# Altium PCB MARLIN.PcbDoc
Units mm, origin at the board's own origin, x right, y up, seen from the top; angles counter-clockwise.
Board outline 14 x 55 mm, 2 copper layers (Top Layer, Bottom Layer), stack 1.595 mm thick; 1 components, 2 nets, 7 pads, 6 vias.
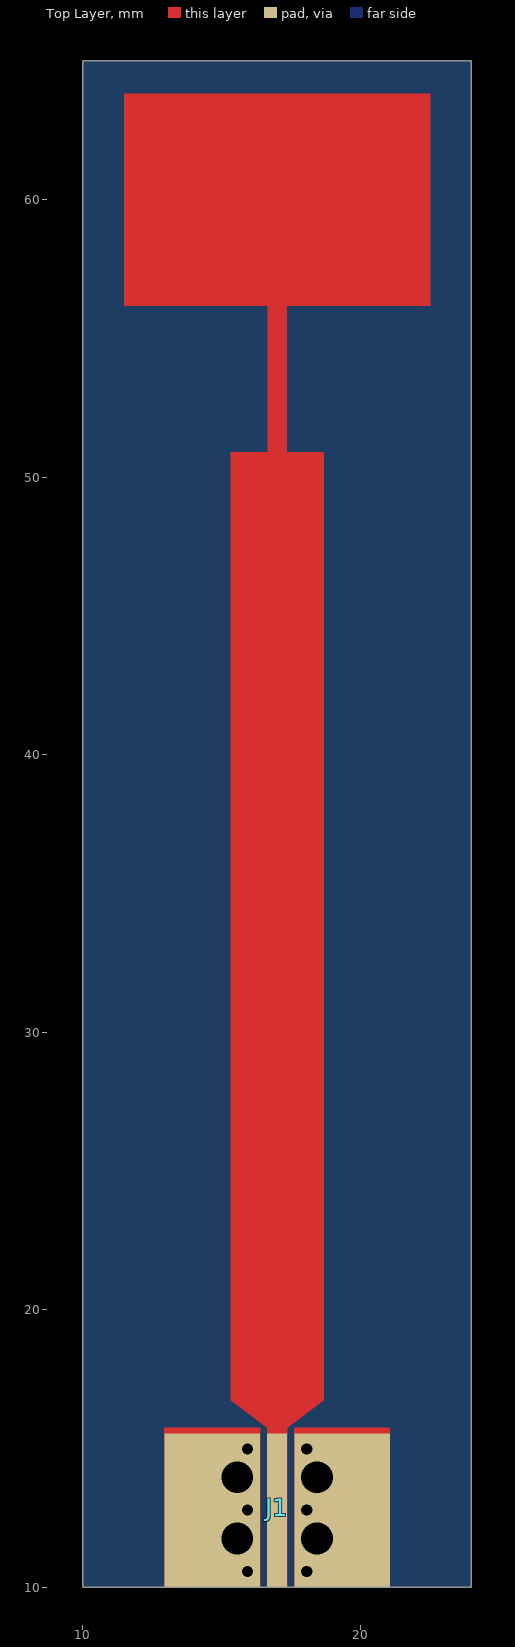
[diagram p0: Top Layer view]
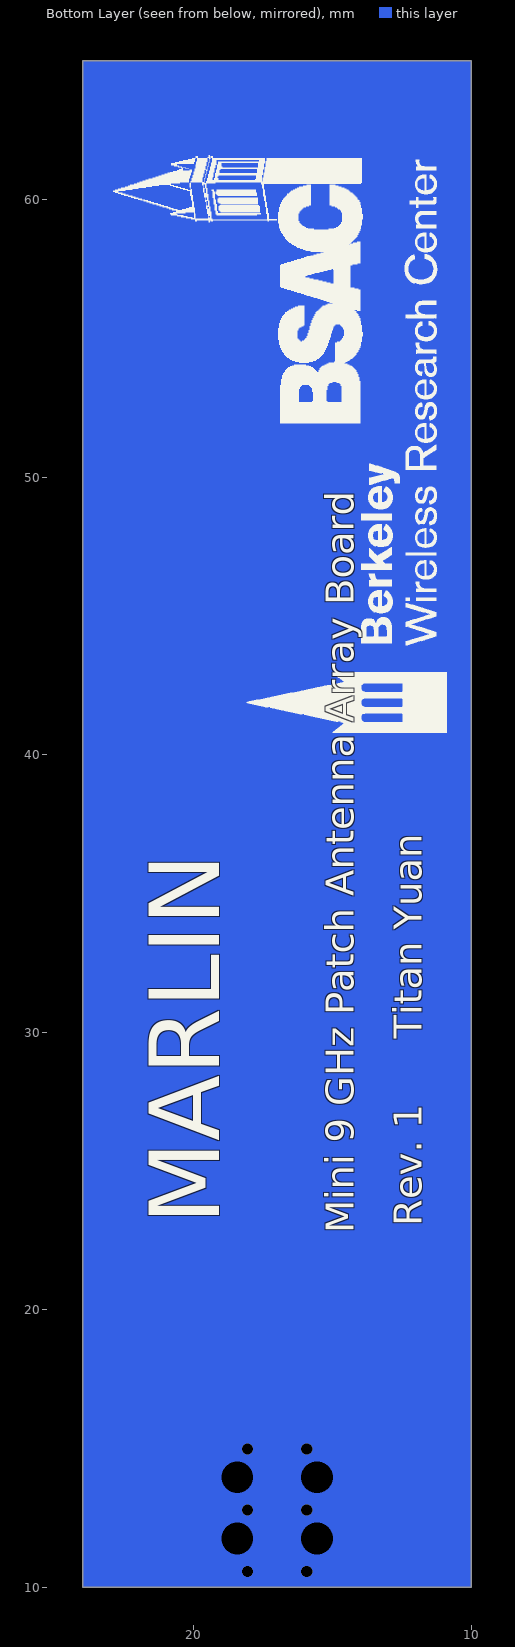
[diagram p1: Bottom Layer view, seen from below]

## Layer stack, top to bottom
Top Solder: solder mask 0.0102, Solder Resist, Dk 3.5
Top Layer: signal copper 0.0356
Dielectric 1: dielectric 1.524, Rogers RO4350B, Dk 3.48
Bottom Layer: signal copper 0.0356
Bottom Solder: solder mask 0.0102, Solder Resist, Dk 3.5

## Board outline
10,10 10,65 24,65 24,10

## Design rules (kind name [scope] priority, off if disabled: settings)
Clearance [All] p1: gap=0.254 ignorepadtopadclearanceinfootprint=FALSE
PolygonConnect [All] p1: connectstyle=Relief reliefconductorwidth=0.254 reliefentries=4 polygonreliefangle="90 Angle" airgapwidth=0.254
RoutingVias [All] p1: holewidth=0.711 width=1.27 viastyle="Through Hole" minholewidth=0.711 minwidth=1.27 maxholewidth=0.711 maxwidth=1.27
SolderMaskExpansion [All] p1: expansion=0 istentingtop=FALSE
SupplyNets "Schematic Supply Nets" [InNet('GND')] p1: voltage=0.000
Width [All] p1: maxlimit=0.254 minlimit=0.254 preferedwidth=0.254
30 further rules are at their usual default settings.

## Classes and differential pairs
net class "50 Ω": ANTENNA_1

## Components (designator, comment, footprint, x,y, rotation, side; value= is the part's Value field where it differs from the comment)
J1 "901-10512-1" 901-10512-1 17,10 r90 top

## Footprints (in the part's own frame and the unit in brackets; to place one, negate y for a bottom-side part, rotate by r counter-clockwise, add the part's x,y. Pads: shape width x height; smd on the part's side, far side on the other; paste and mask are expansions set on the pad)
901-10512-1 [mm] "SMA PCB End Launch Straight Jack 50 Ohm 0.085 Square Flange High Frequency 0.015 Pin"
  rect 5.54x0.72 smd: 1(2.77,0)
  round 0 hole 1.14: 2(1.75,-1.435) 2(1.75,1.435) 2(3.96,-1.435) 2(3.96,1.435)
  rect 5.54x3.45 smd: 2(2.77,-2.34) 2(2.77,2.34)
  body extent -9.53,-3.18 4.55,3.18, height 3.36

## Part data
J1: library part CONN_RF_SMA, "RF / Coaxial Connector, SMA Coaxial, Straight Flanged Jack, Solder, 50 ohm, Beryllium Copper", Case/Package=SMA, Clock Frequency=26.5GHz, Manufacturer="Amphenol RF", Max Operating Temperature=165°C, Maximum Frequency="26.5 GHz", Min Operating Temperature=-65°C, Supplier Part Number=ARF2501-ND, Voltage Rating=170V, Category="RF / Coaxial Connectors", ComponentLink1Description=https://datasheet.octopart.com:443/901-10512-1-Amphenol-RF-datasheet-67291281.pdf?src-supplier=TME, ComponentLink1URL=https://datasheet.octopart.com:443/901-10512-1-Amphenol-RF-datasheet-67291281.pdf?src-supplier=TME, ComponentLink2Description=https://datasheet.octopart.com:443/901-10512-1-Amphenol-datasheet-151206439.pdf?src-supplier=IHS, ComponentLink2URL=https://datasheet.octopart.com:443/901-10512-1-Amphenol-datasheet-151206439.pdf?src-supplier=IHS, ComponentLink3Description=https://datasheet.octopart.com:443/901-10512-1-Amphenol-RF-datasheet-67291285.pdf?src-supplier=Newark, ComponentLink3URL=https://datasheet.octopart.com:443/901-10512-1-Amphenol-RF-datasheet-67291285.pdf?src-supplier=Newark, ComponentLink4Description=https://datasheet.octopart.com:443/901-10512-1-Amphenol-RF-datasheet-114836026.pdf?src-supplier=RS+(Formerly+Allied+Electronics), ComponentLink4URL=https://datasheet.octopart.com:443/901-10512-1-Amphenol-RF-datasheet-114836026.pdf?src-supplier=RS+(Formerly+Allied+Electronics), ComponentLink5Description=https://datasheet.octopart.com:443/901-10512-1-Amphenol-RF-datasheet-177020667.pdf?src-supplier=Burklin+Elektronik, ComponentLink5URL=https://datasheet.octopart.com:443/901-10512-1-Amphenol-RF-datasheet-177020667.pdf?src-supplier=Burklin+Elektronik, ComponentLink6Description=https://datasheet.octopart.com:443/901-10512-1-Amphenol-RF-datasheet-181430700.pdf?src-supplier=JRH+Electronics, ComponentLink6URL=https://datasheet.octopart.com:443/901-10512-1-Amphenol-RF-datasheet-181430700.pdf?src-supplier=JRH+Electronics, Connector Type="SMA, Socket", Contact Material=Copper, Fastening Type=Threaded, Impedance=50Ω, Lifecycle Status=Production, Manufacturer Part Number=901-10512-1, Mounting Technology="Edge, Through Hole", Orientation=Straight, Pricing="1=11.81, 10=10.038, 25=9.4088, 50=8.9596, 100=8.532, 300=7.89597, 500=7.6167, 1000=7.25362 (USD)", RoHS=Compliant, Stock=3551, Supplier=DigiKey, Termination=Solder

## Via types
v1: diameter 0.4, hole 0.4, Top Layer to Bottom Layer, 6 vias

## Nets (pads, with @x,y where several pads share a name; then routed paths per layer and width w, separated by ;. In a path a pad name is that pad's centre, name@x,y a point inside that pad or via, vN(x,y) a via of type N, cw(c..) or ccw(c..) an arc to the next point about the centre after c; other vN are vias at no path point)
ANTENNA_1: J1.1
GND: J1.2
  other v1: 15.935,10.56 18.065,10.56 15.935,12.77 18.065,12.77 15.935,14.98 18.065,14.98

## Other copper
Top Layer:
  region: 15.565,11.345 cw(c15.565,11.75) 15.565,12.155 cw(c15.565,11.75) 15.971,11.75 16.385,11.75 16.385,13.96 15.971,13.96 cw(c15.565,13.96) 15.565,13.555 cw(c15.565,13.96) 15.565,14.365 cw(c15.565,13.96) 15.971,13.96 16.385,13.96 16.385,15.74 12.936,15.74 12.936,10 16.385,10 16.385,11.75 15.971,11.75 cw(c15.565,11.75)
  region: 17.616,10 17.616,11.75 18.03,11.75 ccw(c18.435,11.75) 18.435,11.345 ccw(c18.435,11.75) 18.841,11.75 ccw(c18.435,11.75) 18.435,12.155 ccw(c18.435,11.75) 18.03,11.75 17.616,11.75 17.616,13.96 18.03,13.96 ccw(c18.435,13.96) 18.435,13.555 ccw(c18.435,13.96) 18.841,13.96 ccw(c18.435,13.96) 18.435,14.365 ccw(c18.435,13.96) 18.03,13.96 17.616,13.96 17.616,15.74 21.065,15.74 21.065,10
  region: 16.64,10 16.64,15.74 15.329,16.74 15.329,50.905 16.66,50.905 16.66,56.175 11.484,56.175 11.484,63.825 22.516,63.825 22.517,63.825 22.517,56.175 22.516,56.175 17.341,56.175 17.341,50.905 18.671,50.905 18.672,50.905 18.672,16.74 18.671,16.74 17.361,15.74 17.361,10 17.36,10
Bottom Layer:
  region net GND: 10,65 24,65 24,10 10,10

## Silkscreen, mask and mechanical layers (free items; w line width, h text height)
Bottom Overlay:
  drawing of 41 lines, arcs and shapes, not listed
  text "Titan Yuan" at 11.789,29.754 h1.02 r270
  text "MARLIN" at 19.094,23.059 h2.54 r270
  text "Rev. 1" at 11.789,23.004 h1.02 r270
  text "Mini 9 GHz Patch Antenna Array Board" at 14.25,22.75 h1.02 r270
Top Solder:
  region: 10,65 24,65 24,10 10,10
Mechanical 1:
  the board outline again, w0.254